# EAGLE board 1795187977849_fontanka (EAGLE 9.6.2)

Size 100 x 80 mm. Coordinates in mm from the lower left corner, seen from the top.
Outline: 0,0 100,0 100,80 0,80 0,0
Copper layers (1*16): Top 0.035mm / dielectric 1.5mm / Bottom 0.035mm
Design rules "default": minimum track width 6mil, minimum drill 0.35mm, track to track 6mil, track to pad 6mil, pad to pad 6mil, via to via 6mil, smd to smd 6mil, copper to edge 40mil, drill to drill 6mil, minimum pad ring 10mil, minimum via ring 8mil, stop-mask expansion 4mil, vias tented up to drill 0mil, thermal gap 10mil

## Footprints (pad centres in the part's own frame; a part is rotated, then mirrored left to right if it is on the bottom)
2POL254 = drill 1.2 long: 1 -1.27,0; 2 1.27,0
E2,5-6E = drill 0.813 pad 1.575: + -1.27,0 | drill 0.813 pad 1.575 octagon: - 1.27,0
3POL254 = drill 1.2 long: 1 -2.54,0; 2 0,0; 3 2.54,0
DO41-10 = drill 1.118: A 5.08,0; C -5.08,0
TO126AV = drill 1.016 long: B 2.286,-1.27; C 0,-1.27; E -2.286,-1.27
0204/7 = drill 0.813 pad 1.676 octagon: 1 -3.81,0; 2 3.81,0
TO92-CBE = drill 0.813 long: B 0,0; C -2.54,0; E 2.54,0
ESP32-PATICE2,54 = drill 0.6 pad 1.778 long: 3,3V 14.24,15.24; CLK -2.54,-15.24; CMD 0,-15.24; EN(RST) 14.24,12.7; GND 14.24,17.78; GND2 10.16,-15.24; GND3 -16.78,17.78; IO0 -16.78,-15.24; IO2 -12.7,-15.24; IO4 -16.78,-12.7; IO5 -16.78,-5.08; IO12 14.24,-15.24; IO13 7.62,-15.24; IO14 14.24,-12.7; IO15 -10.16,-15.24; IO16 -16.78,-10.16; IO17 -16.78,-7.62; IO18 -16.78,-2.54; IO19 -16.78,0; IO21 -16.78,5.08; IO22 -16.78,12.7; IO23 -16.78,15.24; IO25 14.24,-5.08; IO26 14.24,-7.62; IO27 14.24,-10.16; IO32 14.24,0; IO33 14.24,-2.54; IO34 14.24,5.08; IO35 14.24,2.54; NC -16.78,2.54; RX -16.78,7.62; SD0 -5.08,-15.24; SD1 -7.62,-15.24; SD2 5.08,-15.24; SD3 2.54,-15.24; SENSOR_VN 14.24,7.62; SENSOR_VP 14.24,10.16; TX -16.78,10.16

## Placement (x,y rotation side)
3,3V  [2POL254]  -30.48,-52.07 0 top  (outside the outline)
BAT  [2POL254]  -30.48,-45.72 0 top  (outside the outline)
C1  1u  [E2,5-6E]  -118.11,-223.52 0 top  (outside the outline)
CERPADLO  [2POL254]  -30.48,-39.37 0 top  (outside the outline)
CERVENA  [2POL254]  -109.22,-179.07 0 top  (outside the outline)
CIDLO-POHYBU  [3POL254]  -116.84,-217.17 0 top  (outside the outline)
D1  1N4007  [DO41-10]  -27.94,-31.75 0 top  (outside the outline)
ORANZOVA  [2POL254]  -109.22,-185.42 0 top  (outside the outline)
PLOVAK  [2POL254]  -40.64,-76.2 0 top  (outside the outline)
Q1  BD139  [TO126AV]  -29.21,-11.43 0 top  (outside the outline)
Q2  BD139  [TO126AV]  -39.37,-88.9 0 top  (outside the outline)
R1  200k  [0204/7]  -29.21,-3.81 0 top  (outside the outline)
R2  30k  [0204/7]  -29.21,-8.89 0 top  (outside the outline)
R3  470  [0204/7]  -29.21,-21.59 0 top  (outside the outline)
R4  10k  [0204/7]  -29.21,-26.67 0 top  (outside the outline)
R5  10k  [0204/7]  -38.1,-81.28 0 top  (outside the outline)
R6  10k  [0204/7]  -38.1,-99.06 0 top  (outside the outline)
R7  470  [0204/7]  -38.1,-104.14 0 top  (outside the outline)
R8  10k  [0204/7]  -90.17,-127 0 top  (outside the outline)
R9  10K  [0204/7]  -90.17,-138.43 0 top  (outside the outline)
R10  10k  [0204/7]  -90.17,-143.51 0 top  (outside the outline)
R11  150  [0204/7]  -106.68,-148.59 0 top  (outside the outline)
R12  10k  [0204/7]  -106.68,-153.67 0 top  (outside the outline)
R13  150  [0204/7]  -106.68,-158.75 0 top  (outside the outline)
R14  150  [0204/7]  -106.68,-163.83 0 top  (outside the outline)
R15  10k  [0204/7]  -106.68,-168.91 0 top  (outside the outline)
R16  10k  [0204/7]  -106.68,-173.99 0 top  (outside the outline)
R17  1k  [0204/7]  -115.57,-196.85 0 top  (outside the outline)
R18  100k  [0204/7]  -115.57,-201.93 0 top  (outside the outline)
R19  10k  [0204/7]  -115.57,-212.09 0 top  (outside the outline)
SVETLO  [2POL254]  -40.64,-109.22 0 top  (outside the outline)
T1  BC337  [TO92-CBE]  -40.64,-67.31 0 top  (outside the outline)
T2  BC337  [TO92-CBE]  -100.33,-139.7 0 top  (outside the outline)
T3  BC337  [TO92-CBE]  -109.22,-139.7 0 top  (outside the outline)
T4  BC337  [TO92-CBE]  -118.11,-189.23 0 top  (outside the outline)
TLAC.RESET  [2POL254]  -40.64,-86.36 0 top  (outside the outline)
U$2  ESP32-PATICEESP32-2,54PIN  [ESP32-PATICE2,54]  -74.93,-102.87 0 top  (outside the outline)
ZAP.SEMAFOR  [2POL254]  -40.64,-124.46 180 top  (outside the outline)
ZAP.SVETLA  [2POL254]  -39.37,-114.3 0 top  (outside the outline)
ZELENA  [2POL254]  -109.22,-191.77 0 top  (outside the outline)

## Library data of the parts
3,3V BAT CERPADLO CERVENA CIDLO-POHYBU ORANZOVA PLOVAK SVETLO TLAC.RESET ZAP.SEMAFOR ZAP.SVETLA ZELENA = con-phoenix-254; OC_FARNELL: unknown; OC_NEWARK: unknown
C1 = rcl-vetši pad; SPICEPREFIX: C
D1 = diode
Q1 Q2 = transistor-power
R1-R19 = rcl-vetši pad; SPICEPREFIX: R
T1-T4 = transistor
U$2 = ESP32-jen čip

## Nets
+3V3: 3,3V.2 R1.2 R5.2 R8.1 R19.1 U$2.3,3V ZAP.SEMAFOR.1 ZAP.SVETLA.1
+12V: BAT.2 CERPADLO.1 CERVENA.2 CIDLO-POHYBU.1 D1.C ORANZOVA.2 SVETLO.1 ZELENA.2
GND: 3,3V.1 BAT.1 C1.- CIDLO-POHYBU.3 PLOVAK.1 Q1.E Q2.E R2.1 R4.2 R6.1 R9.1 R10.1 R12.1 R15.1 R16.1 R18.1 T1.E T2.E T3.E T4.E TLAC.RESET.1 U$2.GND
N$1: R1.1 R2.2 U$2.IO34
N$2: R3.1 U$2.IO26
N$3: Q1.B R3.2 R4.1
N$4: CERPADLO.2 D1.A Q1.C
N$5: R19.2 T4.C U$2.IO22
N$6: R11.1 U$2.IO21
N$7: PLOVAK.2 R5.1 U$2.IO27
N$8: C1.+ R8.2 TLAC.RESET.2 U$2.EN(RST)
N$9: R7.1 U$2.IO25
N$10: Q2.B R6.2 R7.2
N$11: R9.2 U$2.IO32 ZAP.SVETLA.2
N$12: R10.2 U$2.IO33 ZAP.SEMAFOR.2
N$14: R11.2 R12.2 T1.B
N$15: R13.1 U$2.IO19
N$16: R14.1 U$2.IO18
N$17: R13.2 R15.2 T2.B
N$18: R14.2 R16.2 T3.B
N$19: T3.C ZELENA.1
N$20: ORANZOVA.1 T2.C
N$21: CERVENA.1 T1.C
N$22: R17.2 R18.2 T4.B
N$23: CIDLO-POHYBU.2 R17.1
SVETLO: Q2.C SVETLO.2

## Tracks (layer width: path | path; a pad name or v marks a point on that pad's centre or on a via)
+3V3  (7 unrouted)
+12V  (7 unrouted)
GND  (21 unrouted)
N$1  (2 unrouted)
N$2  (1 unrouted)
N$3  (2 unrouted)
N$4  (2 unrouted)
N$5  (2 unrouted)
N$6  (1 unrouted)
N$7  (2 unrouted)
N$8  (3 unrouted)
N$9  (1 unrouted)
N$10  (2 unrouted)
N$11  (2 unrouted)
N$12  (2 unrouted)
N$14  (2 unrouted)
N$15  (1 unrouted)
N$16  (1 unrouted)
N$17  (2 unrouted)
N$18  (2 unrouted)
N$19  (1 unrouted)
N$20  (1 unrouted)
N$21  (1 unrouted)
N$22  (2 unrouted)
N$23  (1 unrouted)
SVETLO  (1 unrouted)

## Text on the board
Bottom: 3,3